# Altium PCB PCB1.PcbDoc (part 2 of 2)
Units mil, origin at the board's own origin, x right, y up, seen from the top; angles counter-clockwise.
Board outline 3937.01 x 2559.06 mil, 4 copper layers (Top Layer, GND, 3V3, Bottom Layer), stack 23.756 mil thick; 182 components, 90 nets, 545 pads, 228 vias.
Unrouted connection lines stored in the file: 5.
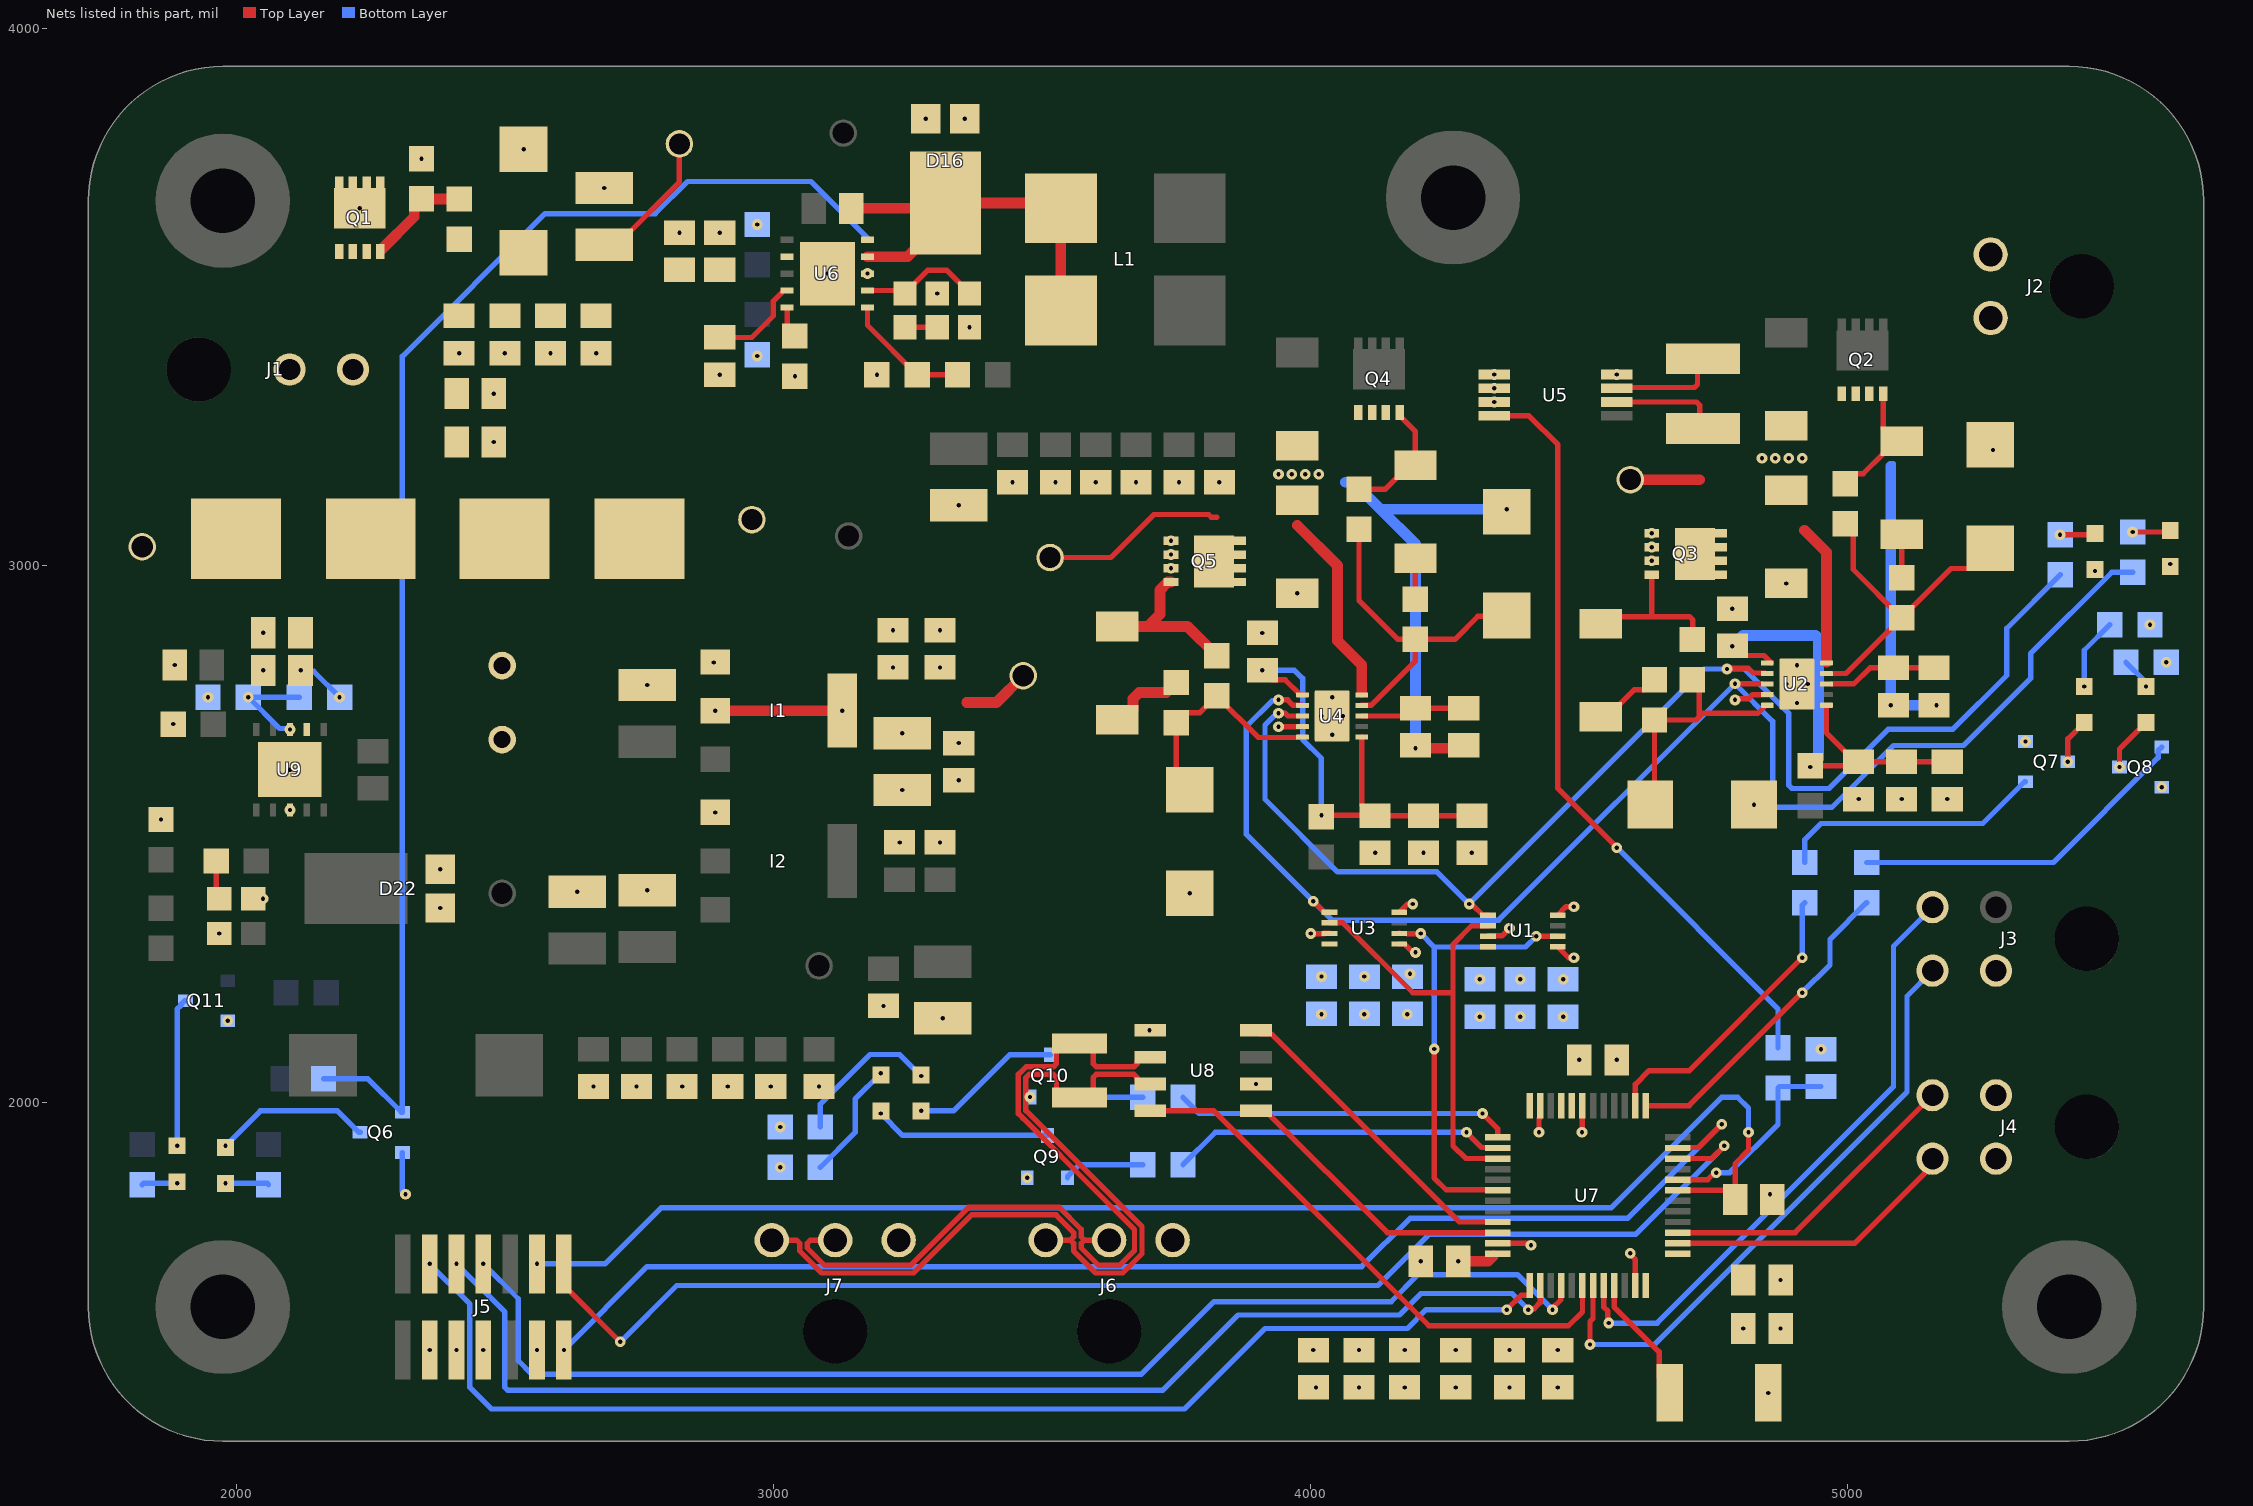
[diagram p4: the nets of this part, all layers, seen from the top]

## Via types
v1: diameter 20, hole 8, Top Layer to Bottom Layer, 228 vias

## Nets (pads, with @x,y where several pads share a name; then routed paths per layer and width w, separated by ;. In a path a pad name is that pad's centre, name@x,y a point inside that pad or via, vN(x,y) a via of type N, cw(c..) or ccw(c..) an arc to the next point about the centre after c; other vN are vias at no path point) (continued)
12V_HB_1: C9.2 C10.1 C11.1 C12.1 R4.1 U2.1 U2.6 | length 893.3
  Top Layer w10: v1(4785,2850) 4802.48,2832.52 4843.9,2832.52 U2.6@4857.64,2818.78 ; R4.1@4930,2627.4 5012.76,2627.4 C11.1@5020,2634.65 ; U2.1@4960.24,2740 4960.24,2688.31 5013.9,2634.65 C11.1@5020,2634.65 ; C12.1@5185,2634.65 C10.1@5100,2634.65 C11.1@5020,2634.65
  Bottom Layer w20: v1(4785,2850) 4804.63,2869.63 4939.51,2869.63 4945.37,2863.77 4945.37,2640.37 v1(4930,2625)
12V_HB_2: C23.1 C24.1 C25.1 C26.2 R15.1 U4.1 U4.6 | length 884.5
  Top Layer w10: C26.2@3910,2805.35 3927.83,2787.52 3952.48,2787.52 3980,2760 U4.6@3985,2760 ; R15.1@4020,2532.4 v1(4020,2535) ; R15.1@4022.6,2535 4113.9,2535 4119.65,2535 C23.1@4120,2534.65 ; U4.1@4095.12,2680.63 4095.12,2553.43 4113.9,2534.65 C23.1@4120,2534.65 ; C25.1@4300,2534.65 C24.1@4210,2534.65 C23.1@4120,2534.65
  Bottom Layer w10: v1(3910,2805) 3970,2805 3985,2790 3985,2676.35 4020,2641.35 v1(4020,2535)
BOOT: C57.2 U9.1 | length 108.6
  Top Layer w10: U9.1@2162.99,2694.8 2208.74,2694.8 2248.9,2654.65 C57.2@2255,2654.65
BOOT: C33.2 U6.1 | length 82.7
  Top Layer w10: U6.1@3025.39,3606.5 3031.3,3606.5 3057.52,3632.72 3057.52,3647.17 C33.2@3075.35,3665
BOOT: R25.2 U7.45 | length 242.9
  Top Layer w10: U7.45@4565,1660 4565,1620.11 4648.66,1536.45 4648.66,1490 4668.46,1470.2 R25.2@4668.46,1460
BOOTSTRAP_1: C16.1 C17.1 U2.3 | length 202.3
  Top Layer w10: U2.3@4970,2780 5011.42,2780 5041.06,2809.65 C17.1@5085,2809.65 C16.1@5160,2809.65
BOOTSTRAP_2: C21.1 C22.1 U4.3 | length 195.9
  Top Layer w10: U4.3@4095.12,2720 4180.35,2720 C21.1@4195,2734.65 C22.1@4285,2734.65
CAN_H: J6.3 J7.3 R32.2 U8.7 | length 1624
  Top Layer w10: J7.3@2996.89,1744.29 3043.09,1744.29 3048.94,1738.43 3048.94,1724.08 3089.73,1683.29 3261.05,1683.29 3369.05,1791.29 3526.36,1791.29 3558.94,1758.7 3558.94,1750.15 3553.09,1744.29 ; J6.3@3506.89,1744.29 3553.09,1744.29 ; U8.7@3701.57,2035 3683.86,2035 3677.05,2041.81 3677.05,2047.14 3671.19,2053 3641.39,2053 3601.05,2053 3595.2,2047.14 3595.2,2023.5 3581.5,2009.8 R32.2@3570,2009.8 3540.5,2009.8 3526.8,2023.5 3526.8,2047.14 3520.95,2053 3475.86,2053 3470,2047.14 3470,1985.56 3619.93,1835.63 3686,1769.56 3686,1719.02 3650.27,1683.29 3599.73,1683.29 3558.94,1724.08 3558.94,1738.43 3553.09,1744.29
CAN_L: J6.2 J7.2 R32.1 U8.6 | length 1600.8
  Top Layer w10: J7.2@3115,1744.29 3068.8,1744.29 3062.94,1738.43 3062.94,1729.88 3095.53,1697.29 3255.25,1697.29 3363.25,1805.29 3532.16,1805.29 3572.94,1764.5 3572.94,1750.15 3578.8,1744.29 ; J6.2@3625,1744.29 3578.8,1744.29 ; U8.6@3701.57,2085 3683.86,2085 3677.05,2078.19 3677.05,2072.86 3671.19,2067 3647.18,2067 3601.05,2067 3595.2,2072.86 3595.2,2096.5 3581.5,2110.2 R32.1@3570,2110.2 3540.5,2110.2 3526.8,2096.5 3526.8,2072.86 3520.95,2067 3470.06,2067 3456,2052.94 3456,1979.76 3464.2,1971.56 3605.93,1829.83 3672,1763.76 3672,1724.82 3644.47,1697.29 3605.53,1697.29 3572.94,1729.88 3572.94,1738.43 3578.8,1744.29
CAN_RX_LED: R33.1 U7.25 | length 626.2
  Top Layer w10: v1(4320,1980) 4348.46,1951.54 U7.25@4348.46,1935.59
  Bottom Layer w10: R33.1@3762.4,2010 3792.4,1980 v1(4320,1980)
CAN_STB: U7.42 U8.8 | length 1029.9
  Top Layer w10: U8.8@3701.57,1985 3820,1985 4220,1585 4480,1585 4505.94,1610.94 U7.42@4505.94,1660
CAN_TX_LED: R30.1 U7.26 | length 623
  Top Layer w10: v1(4290,1945) 4318.09,1916.91 4347.46,1916.91 U7.26@4348.46,1915.91
  Bottom Layer w10: R30.1@3762.4,1885 3822.4,1945 v1(4290,1945)
COMP: C56.2 R38.2 U9.7 | length 285.5
  Top Layer w10: C56.2@2031.5,2315 2032.48,2315 2085,2367.52 2085,2402.4 R38.2@2037.4,2450 2068.5,2481.1 U9.7@2068.5,2545.2
COMP: C32.2 R20.2 U6.7 | length 229.5
  Top Layer w10: U6.7@3175,3512.01 3239.49,3512.01 R20.2@3245,3506.5 3245,3507.48 3287.52,3550 3322.48,3550 3365,3507.48 C32.2@3365,3506.5
CS: C27.2 R16.2 U7.8 | length 378.4
  Top Layer w10: U7.8@4683.11,1856.85 4739.14,1856.85 4752.29,1870 v1(4755,1870)
  Bottom Layer w10: v1(4755,1870) 4780,1870 4870,1960 R16.2@4870,2027.6 4872.76,2030.35 C27.2@4950,2030.35
DEBUG_1: R27.1 U7.13 | length 595.4
  Top Layer w10: U7.13@4624.06,1994.65 4704.65,1994.65 v1(4915,2205)
  Bottom Layer w10: v1(4915,2205) 4966.65,2256.65 4966.65,2304.24 R27.1@5035,2372.6
DEBUG_2: R26.1 U7.14 | length 552.6
  Top Layer w10: U7.14@4604.37,1994.65 4604.37,2034.37 4630,2060 4705,2060 v1(4915,2270)
  Bottom Layer w10: v1(4915,2270) 4915,2367.6 R26.1@4920,2372.6
EN: R35.1 R36.2 U9.3 | length 197.7
  Bottom Layer w10: v1(2100,2694.8) 2098.09,2696.72 2080.69,2696.72 v1(2022.4,2755) R35.1@2117.6,2755
FB: R41.1 R42.2 U9.6 | length 305.6
  Top Layer w10: R41.1@1860,2362.4 R42.2@1860,2452.6 1905.22,2452.6 1997.82,2545.2 U9.6@2037.01,2545.2
FB: R23.1 R24.2 U6.6 | length 239
  Top Layer w10: U6.6@3175,3480.51 3175,3447.4 R24.2@3267.4,3355 R23.1@3342.6,3355
FDCAN_RX: U7.33 U8.4 | length 597.9
  Top Layer w10: U8.4@3898.43,2135 3905.24,2128.19 3926.81,2128.19 4276.89,1778.11 U7.33@4348.46,1778.11
FDCAN_TX: U7.34 U8.1 | length 543.9
  Top Layer w10: U8.1@3898.43,1985 3916.14,1985 4142.72,1758.43 U7.34@4348.46,1758.43
GND: C1.1 C2.1 C3.1 C4.1 C5.1 C6.1 C7.1 C8.1 C9.1 C10.2 C11.2 C12.2 C13.2 C14.2 C15.2 C18.2 C19.2 C20.2 C23.2 C24.2 C25.2 C26.1 C27.1 C28.1 C29.1 C30.1 C31.1 C32.1 C34.1 C35.1 C36.1 C37.1 C38.1 C39.1 C40.1 C41.2 C42.1 C43.1 C44.1 C45.1 C46.1 C47.1 C48.1 C49.1 C50.1 C51.1 C52.1 C53.1 C54.1 C55.1 C56.1 C58.1 C59.1 C60.1 C61.1 C62.1 C63.1 C64.1 C65.1 C66.1 C67.1 C68.1 C69.1 C70.1 C71.1 C72.1 C73.1 C74.1 D1.1 D2.1 D8.1 D10.1 D15.1 D16.1 D22.1 DIR1.2 DIR2.2 I1.1 I2.1 J3.2 J4.1 J4.2 J5.05 J5.07 J5.11 J6.1 J7.1 Q1.3 Q3.2 Q5.2 Q6.2 Q7.2 Q8.2 Q9.2 Q10.2 Q11.2 R2.2 R18.1 R19.1 R24.1 R25.1 R36.1 R37.1 R42.1 U1.1 U1.4 U1.7 U2.9 U2.11 U3.1 U3.4 U3.7 U4.9 U4.11 U5.4 U5.7 U6.8 U6.11 U7.19 U7.23 U7.35 U7.47 U8.2 U9.8 U9.11 | length 641.2
  Top Layer w10: v1(3940,2700) U4.9@3984.88,2700 ; v1(4000,2315) 4025.08,2315 4025.39,2315.31 U3.7@4035.08,2315.31 ; U3.1@4165,2295.63 4174.69,2295.63 4188.4,2281.91 4193.09,2281.91 v1(4195,2280) ; U3.4@4165,2354.68 4165,2355 4180,2370 v1(4190,2370) ; U1.7@4330,2310 4330.76,2310.76 4355.76,2310.76 v1(4370,2325) ; U7.35@4348.46,1738.74 4403.55,1738.74 4407.29,1735 v1(4410,1735) ; v1(4425,1945) 4425,1970 4426.2,1971.2 4426.2,1993.65 U7.23@4427.2,1994.65 ; U1.1@4459.92,2290.32 4459.92,2290 4479.92,2270 v1(4490,2270) ; U1.4@4459.92,2349.37 4459.92,2349.68 4475.24,2365 v1(4490,2365) ; v1(4505,1945) 4505.47,1945.47 4505.47,1994.17 U7.19@4505.94,1994.65 ; v1(4595,1720) 4595,1717.29 4604.37,1707.92 U7.47@4604.37,1660 ; v1(4790,2750) 4791.9,2751.9 4815,2751.9 4822.79,2759.69 U2.9@4850,2759.69
  Bottom Layer w10: Q6.2@2309.37,1907.6 2309.37,1835.63 v1(2315,1830)
  other v1: 4851.54,1460 4010,1470 4090,1470 4175,1470 4270,1470 4370,1470 4460,1470 2410,1540 2460,1540 2560,1540 4874.65,1580 4874.65,1670 4205,1705 4855,1830 3472.6,1860.63 3477.6,2010.63 2665,2030.35 2745,2030.35 2830,2030.35 2915,2030.35 2995,2030.35 3085,2030.35 3898.43,2035 4570,2080 4950,2099.65 1984.37,2152.6 3315,2157.2 4315,2160 4390,2160 4470,2160 4020,2165 4100,2165 4180,2165 3205,2180.35 1968.5,2315 2380,2362.56 2050,2380 3775,2389.88 2635,2392.8 2765,2395.59 2380,2435 4120,2465.35 4210,2465.35 4300,2465.35 3235,2484.65 3310,2484.65 1860,2527.4 2891.89,2540.55 2100,2545.2 4825.12,2555 5020,2565.35 5100,2565.35 5185,2565.35 3240,2582.2 5584.37,2587.6 3345,2600.35 2100,2620 5330.63,2672.4 1882.6,2705 1947.6,2755 2765,2777.8 2050.35,2805 1885.35,2815 2889.01,2819.56 2050.35,2875 3910,2874.65 3222.5,2879.65 3310,2879.65 4785,2919.65 3975,2948.39 4885,2966.77 5460,2990 3740,2995 5600,3003 4635,3008.81 3740,3020.59 4635,3034.4 3740,3046.19 4635,3060 3345,3112.2 3445,3155.35 3525,3155.35 3600,3155.35 3675,3155.35 3755,3155.35 3830,3155.35 2479.65,3230 4341.65,3304.41 2479.65,3320 3040,3352.6 2900,3355.35 3192.6,3355 4570,3355.59 2970,3390 2415,3395.35 2500,3395.35 2585,3395.35 2670,3395.35 3365,3443.5 3305,3506.5 3100.2,3543.5 3175,3543.5 2825,3619.65 2900,3619.65 2230,3665 2685,3702.8 2345,3757.4 2535,3775.12 3283.78,3831.77 3356.22,3831.77
HS_GATE_1: D3.2 R6.1 R8.1 U2.4 | length 619.8
  Top Layer w10: U2.4@4960.24,2799.02 4996.42,2799.02 R6.1@5100,2902.6 ; R8.1@4995,3077.6 5010,3062.6 5010,2992.6 R6.1@5100,2902.6 ; D3.2@5265,3032.2 5227.48,2994.68 5192.09,2994.68 R6.1@5100,2902.6
HS_GATE_2: D14.2 R10.1 R12.1 U4.4 | length 630.6
  Top Layer w10: R10.1@4090,3067.6 4090,2934.83 4162.24,2862.6 R12.1@4195,2862.6 ; U4.4@4095.12,2739.68 4112.49,2739.68 4195,2822.2 R12.1@4195,2862.6 ; D14.2@4365,2907.2 4363.44,2905.64 4311.37,2905.64 4268.33,2862.6 R12.1@4195,2862.6
LIMIT_A: J4.4 U7.2 | length 547.2
  Top Layer w10: U7.2@4683.11,1738.74 5013.28,1738.74 5157.6,1883.06 J4.4@5157.6,1895.94
LIMIT_B: J4.3 U7.3 | length 580.4
  Top Layer w10: U7.3@4683.11,1758.43 4901.97,1758.43 J4.3@5157.6,2014.06
LS_GATE_1: D2.2 R5.1 R7.1 U2.10 | length 452.7
  Top Layer w10: D2.2@4632.2,2555 4640,2562.8 R5.1@4640,2712.6 4717.4,2712.6 4723.26,2718.46 ; R7.1@4710,2787.6 4723.26,2774.34 4723.26,2718.46 ; U2.10@4846.25,2739.06 4832.19,2725 4729.8,2725 4723.26,2718.46
LS_GATE_2: D15.2 R11.1 R13.1 U4.10 | length 416.2
  Top Layer w10: D15.2@3775,2582.8 3750,2607.8 R13.1@3750,2707.6 3768.62,2726.22 3793.62,2726.22 R11.1@3825,2757.6 3902.6,2680 3975.09,2680 3975.44,2680.35 U4.10@3978.07,2680.35
M+: J2.2 R14.2 U5.3 | length 204.7
  Top Layer w10: U5.3@4570,3330 4592.91,3330 4594.5,3331.59 4714.14,3331.59 4720,3337.45 4720,3374.96 R14.2@4730,3384.96
M+_beforeCURR: C16.2 C17.2 D3.1 D7.1 D8.2 M+.1 Q2.2 Q3.3 R14.1 U2.5 U5.2 | length 1174
  Top Layer w10: U5.2@4570,3304.41 4718.28,3304.41 4724.14,3298.55 4724.14,3260.9 R14.1@4730,3255.04 R14.1@4770.35,3255.04 ; v1@4838.09,3201.91 v1(4840,3200)
  Top Layer w20: M+.1@4595,3160 4723.93,3160 ; 4919.37,3065.63 4960,3025 U2.5@4960,2820
  Bottom Layer w10: 5080,3185 5085,3190
  Bottom Layer w20: 5080,3185 v1(5080,2740) v1(5165,2740)
  other v1: 4865,3200 4890,3200 4915,3200 5270,3215
M-: C21.2 C22.2 D9.1 D10.2 D14.1 J2.1 M-.1 Q4.2 Q5.3 U4.5 | length 1590.1
  Top Layer w10: M-.1@3515,3015 3628.07,3015 3708.07,3095 3810,3095 3815,3090 3825,3090
  Top Layer w20: 3975,3075 4050,3000 4050,2860 4095.12,2814.88 4095.12,2764.68 ; v1(4195,2660) 4279.65,2660 C22.2@4285,2665.35
  Bottom Layer w20: 4065,3155 4080,3155 4130,3105 ; v1(4195,2660) 4195,3040 4130,3105 ; v1(4365,3105) 4130,3105
  other v1: 3940,3170 3965,3170 3990,3170 4015,3170
MOTOR_DIR: U1.6 U3.6 U7.27 | length 831.5
  Top Layer w10: U3.6@4035.08,2335 4060,2335 4190,2205 4265,2205 ; U1.6@4330,2329.88 4299.88,2329.88 4265,2295 4265,2205 ; U7.27@4348.46,1896.22 4288.78,1896.22 4265,1920 4265,2205
MOTOR_DIR_IN_1: R3.1 U1.5 U2.7 U4.8 | length 2471
  Top Layer w10: v1(3940,2725) 3953.07,2725 3958.07,2720 U4.8@3984.88,2720 ; v1(4295,2370) 4296.91,2368.09 4301.6,2368.09 4320.31,2349.37 U1.5@4330,2349.37 ; v1(4775.09,2807.52) 4776.4,2808.82 4815,2808.82 4823.82,2800 4844.94,2800 4845.88,2799.06 U2.7@4850,2799.06
  Bottom Layer w10: v1(3940,2725) 3937.29,2725 3932.29,2720 3931.72,2720 3915,2703.28 3915,2565 4050,2430 4235,2430 v1(4295,2370) 4732.52,2807.52 v1(4775.09,2807.52) 4807.48,2807.52 4890,2725 4890,2590.86 4895.86,2585 4965,2585 5075,2695 5195,2695 5295.69,2795.69 5295.69,2883.29 R3.1@5395,2982.6
MOTOR_DIR_IN_2: R9.1 U2.8 U3.5 U4.7 | length 2710.8
  Top Layer w10: v1(3940,2750) 3957.2,2750 3967.51,2739.68 U4.7@3984.88,2739.68 ; v1(4005,2375) 4005.08,2375 4025.39,2354.68 U3.5@4035.08,2354.68 ; v1(4790,2780) U2.8@4840,2780
  Bottom Layer w10: v1(3940,2750) 3938.09,2748.09 3928.09,2748.09 3880,2700 3880,2500 v1(4005,2375) 4040,2340 4350,2340 v1(4790,2780) 4860,2710 4860,2555.86 4865.86,2550 4970,2550 5085,2665 5215,2665 5340.13,2790.13 5340.13,2836.35 5491.38,2987.6 R9.1@5530,2987.6
MOTOR_PWM: U1.2 U3.2 U7.30 | length 871.6
  Top Layer w10: U3.2@4165,2315.31 4165.08,2315.24 4179.76,2315.24 4180,2315 v1(4205,2315) ; v1(4230,2100) 4230,1860 4251.83,1838.17 4347.46,1838.17 U7.30@4348.46,1837.17 ; v1(4420,2310) U1.2@4459.92,2310
  Bottom Layer w10: v1(4205,2315) 4230,2290 ; v1(4230,2100) 4230,2290 ; v1(4420,2310) 4400,2290 4230,2290
NetC31_2: C31.2 R20.1 | length 60
  Top Layer w10: R20.1@3245,3443.5 C31.2@3305,3443.5
NetC55_2: C55.2 R38.1 | length 72.4
  Top Layer w10: R38.1@1962.6,2450 1962.6,2385.91 C55.2@1968.5,2380
NetD4_1: DIR1.1 R3.2 | length 66.1
  Top Layer w10: v1(5395,3057.4) 5457.4,3057.4 DIR1.1@5460,3060
NetD5_1: D5.1 Q3.1 R7.2 | length 293
  Top Layer w10: D5.1@4540,2891.61 4553.39,2905 4635,2905 4705,2905 4711.38,2898.62 4711.38,2863.78 R7.2@4710,2862.4 ; 4635,2906.61 Q3.1@4635,2983.22
NetD5_2: D5.2 R5.2 | length 128.6
  Top Layer w10: D5.2@4540,2718.39 4551.81,2718.39 4602.2,2768.78 4621.38,2768.78 R5.2@4640,2787.4
NetD6_1: D6.1 Q2.1 R8.2 | length 236.2
  Top Layer w10: R8.2@4995,3152.4 5013.62,3171.02 5028.62,3171.02 5065.63,3208.03 5065.63,3209.06 D6.1@5088.19,3231.61 ; Q2.1@5065.59,3320 5065.59,3282.72 5065.63,3282.68 5065.63,3254.17 D6.1@5088.19,3231.61 ; D6.1@5100,3231.61 D6.1@5088.19,3231.61
NetD6_2: D6.2 R6.2 | length 81
  Top Layer w10: R6.2@5100,2977.4 D6.2@5100,3058.39
NetD11_1: DIR2.1 R9.2 | length 71.1
  Top Layer w10: v1(5530,3062.4) 5597.4,3062.4 DIR2.1@5600,3065
NetD12_1: D12.1 Q4.1 R10.2 | length 233.9
  Top Layer w10: R10.2@4090,3142.4 4138.98,3142.4 4183.19,3186.61 D12.1@4195,3186.61 4195,3249.68 4165.59,3279.09 Q4.1@4165.59,3285
NetD12_2: D12.2 R12.2 | length 76
  Top Layer w10: R12.2@4195,2937.4 D12.2@4195,3013.39
NetD13_1: D13.1 Q5.1 R11.2 | length 311.6
  Top Layer w20: D13.1@3640,2886.61 3696.81,2886.61 ; Q5.1@3740,2969.41 3734.09,2969.41 3719.37,2954.69 3719.37,2909.17 3696.81,2886.61 ; R11.2@3825,2832.4 3770.79,2886.61 3696.81,2886.61
NetD13_2: D13.2 R13.2 | length 151
  Top Layer w20: D13.2@3640,2713.39 3651.81,2713.39 3669.37,2730.94 3669.37,2752.06 3681.09,2763.78 3731.38,2763.78 R13.2@3750,2782.4
NetD17_1: 12V.1@1980,1850 R22.1 | length 81
  Bottom Layer w10: v1(1980,1850) 2057.6,1850 R22.1@2060,1847.6
NetD17_2: 12V.2 Q6.3 | length 294.1
  Bottom Layer w10: v1(1980,1920) 2045,1985 2188.66,1985 2228.66,1945 Q6.3@2230.63,1945
NetD18_1: BUG1.1 R28.1 | length 134.7
  Bottom Layer w10: v1(5440,2775) 5440,2842.4 R28.1@5487.6,2890
NetD18_2: BUG1.2 Q7.3 | length 85.7
  Top Layer w10: v1(5409.37,2635) 5409.37,2677.37 BUG1.2@5440,2708
NetD19_1: BUG2.1 R29.1 | length 60.5
  Bottom Layer w10: R29.1@5517.6,2820 5551.94,2785.66 5551.94,2778.06 v1(5555,2775)
NetD19_2: BUG2.2 Q8.3 | length 103.4
  Top Layer w10: v1(5505.63,2625) 5505.63,2658.63 BUG2.2@5555,2708
NetD20_1: R31.1 TX.1 | length 221.6
  Bottom Layer w10: R31.1@3087.4,1880 3152.06,1944.65 3152.06,2007.06 v1(3200,2055)
NetD20_2: Q9.3 TX.2 | length 326.8
  Bottom Layer w10: v1(3200,1980) 3240.63,1939.37 Q9.3@3510,1939.37
NetD21_1: R34.1 RX.1 | length 284.9
  Bottom Layer w10: R34.1@3087.4,1955 3087.4,1997.4 3180,2090 3235,2090 v1(3275,2050)
NetD21_2: Q10.3 RX.2 | length 283.2
  Bottom Layer w10: v1(3275,1985) 3335,1985 3439.37,2089.37 Q10.3@3515,2089.37
NetD23_1: 7V.1@1890,1853 R40.1 | length 66
  Bottom Layer w10: R40.1@1825,1847.6 1827.4,1850 v1(1890,1850)
NetD23_2: 7V.2 Q11.3 | length 277.6
  Bottom Layer w10: v1(1890,1920) 1890,2174.37 1896.85,2181.22 1896.85,2183.19 1903.66,2190 Q11.3@1905.63,2190
NetJ1_1: J1.1 Q1.2
NetQ1_1: Q1.1 R1.2 R2.1 | length 195.1
  Top Layer w20: Q1.1@2270.52,3588.47 2331.38,3649.33 2331.38,3668.98 R2.1@2345,3682.6 2345.1,3682.5 2414.9,3682.5 R1.2@2415,3682.4
NetQ7_1: Q7.1 R26.2 | length 497.8
  Bottom Layer w10: R26.2@4920,2447.4 4920,2490 4950,2520 5251.06,2520 5328.66,2597.6 Q7.1@5330.63,2597.6
NetQ8_1: Q8.1 R27.2 | length 646.1
  Bottom Layer w10: R27.2@5035,2447.4 5382.4,2447.4 5577.48,2642.48 5577.48,2655.59 5584.3,2662.4 Q8.1@5584.37,2662.4
NetQ9_1: Q9.1 R30.2 | length 151.4
  Bottom Layer w10: Q9.1@3547.4,1860.63 3547.4,1862.6 3569.8,1885 R30.2@3687.6,1885
NetQ10_1: Q10.1 R33.2 | length 135.5
  Bottom Layer w10: Q10.1@3552.4,2010.63 3686.97,2010.63 R33.2@3687.6,2010
NetR16_1: R16.1 U5.8 | length 1433.1
  Top Layer w10: U5.8@4341.65,3278.82 4406.18,3278.82 4460,3225 4460,2585 v1(4570,2475)
  Bottom Layer w10: v1(4570,2475) 4870,2175 R16.1@4870,2102.4
NRST: C41.1 J5.12 U7.7 | length 2686.2
  Top Layer w10: U7.7@4683.11,1837.17 4773.19,1837.17 C41.1@4790.35,1820 4790.35,1887.1 4815,1911.75 v1(4815,1945)
  Bottom Layer w10: v1(2560,1700.24) 2686.47,1700.24 2791.24,1805 4560,1805 4765,2010 4795,2010 4815,1990 v1(4815,1945)
PWRGD: Q11.1 R39.1 U9.10 | length 486.9
  Bottom Layer w10: Q11.1@1984.37,2227.4 1986.34,2227.4 2008.74,2205 R39.1@2092.6,2205 2095,2207.4 2095,2310 2162.99,2377.99 v1(2162.99,2545.2)
  other v1: 3175,3606.5
PWRGD: Q6.1 R21.1 U6.10 | length 2626.3
  Bottom Layer w10: R21.1@2162.4,2045 2244.8,2045 2307.4,1982.4 Q6.1@2309.37,1982.4 2309.37,3389.37 2575,3655 2780,3655 2840,3715 3070,3715 3176.75,3608.25
QUAD_A: J3.4 U7.43 | length 1142.7
  Top Layer w10: v1(4520,1550) 4520,1592.71 4525.63,1598.34 U7.43@4525.63,1660
  Bottom Layer w10: v1(4520,1550) 4640,1550 5110,2020 5110,2198.35 J3.4@5157.6,2245.94
QUAD_B: J3.3 U7.44 | length 1150.4
  Top Layer w10: U7.44@4545.31,1660 4545.31,1620 4553.09,1612.23 4553.09,1591.91 v1(4555,1590)
  Bottom Layer w10: v1(4555,1590) 4645,1590 5085,2030 5085,2291.46 J3.3@5157.6,2364.06
RT/CLK: R37.2 U9.5 | length 83.8
  Top Layer w10: R37.2@1957.4,2705 2024.53,2705 2034.72,2694.8 U9.5@2037.01,2694.8
RT/CLK: R19.2 U6.5 | length 59.2
  Top Layer w10: U6.5@3025.39,3480.51 3025.39,3442.01 R19.2@3040,3427.4
SS/TR: C54.2 U9.4 | length 184.5
  Top Layer w10: C54.2@1954.65,2815 1963.08,2806.57 1963.08,2776.92 2011.28,2728.72 2040.5,2728.72 2068.5,2700.71 U9.4@2068.5,2694.8
SS/TR: C30.2 U6.4 | length 177.7
  Top Layer w10: C30.2@2900,3424.65 2959.65,3424.65 3000,3465 3000,3492.52 3019.49,3512.01 U6.4@3025.39,3512.01
STLINK_RX: J5.13 U7.11 | length 2429.1
  Top Layer w10: U7.11@4683.11,1915.91 4700.61,1915.91 4701.61,1916.91 4721.91,1916.91 v1(4765,1960)
  Bottom Layer w10: v1(2610,1540) 2765,1695 4095,1695 4185,1785 4590,1785 v1(4765,1960)
STLINK_TX: J5.14 U7.10 | length 2491.7
  Top Layer w10: J5.14@2610,1700.24 2610,1659.88 2714.88,1555 v1(2715,1555) ; U7.10@4683.11,1896.22 4746.22,1896.22 v1(4770,1920)
  Bottom Layer w10: v1(2715,1555) 2820,1660 4125,1660 4220,1755 4605,1755 v1(4770,1920)
SW: C57.1 D22.2 L2.1 U9.9 | length 756.1
  Top Layer w20: U9.9@2131.5,2545.2 2131.5,2488.5 2145.94,2474.06 2145.94,2446.54 2193.7,2398.78 D22.2@2223.23,2398.78 ; L2.1@2161.5,2070 2161.5,2337.64 2222.64,2398.78 D22.2@2223.23,2398.78 ; C57.1@2255,2585.35 2255,2430.55 D22.2@2223.23,2398.78
SW: C33.1 D16.2 L1.1 U6.9 | length 792.4
  Top Layer w20: C33.1@3144.65,3665 3310,3665 D16.2@3320,3675 ; U6.9@3175,3575 3249.53,3575 3320,3645.47 D16.2@3320,3675 ; L1.1@3535,3475 L1.1@3535,3665 3525,3675 3330,3675 D16.2@3320,3675
SWCLK: J5.06 U7.38 | length 2321.2
  Top Layer w10: v1(4405,1615) 4406.91,1616.91 4416.21,1616.91 4427.2,1627.9 U7.38@4427.2,1660
  Bottom Layer w10: v1(2410,1700.24) 2500,1610.24 2500,1470 2505,1465 3725,1465 3865,1605 4165,1605 4205,1645 4375,1645 v1(4405,1615)
SWDIO: J5.04 U7.37 | length 2355.9
  Top Layer w10: v1(4365,1615) 4391.5,1641.5 4406.52,1641.5 4407.52,1642.5 U7.37@4407.52,1660
  Bottom Layer w10: v1(2360,1700.24) 2435,1625.24 2435,1470 2475,1430 3765,1430 3915,1580 4180,1580 4215,1615 v1(4365,1615)
SWO: J5.08 U7.40 | length 2297.9
  Top Layer w10: v1(4450,1615) 4450,1617.71 4465.57,1633.28 4465.57,1659 U7.40@4466.57,1660
  Bottom Layer w10: v1(2460,1700.24) 2525,1635.24 2525,1520 2550,1495 3685,1495 3820,1630 4150,1630 4200,1680 4385,1680 v1(4450,1615)
VBAT: C1.2 C2.2 C3.2 C4.2 C5.2 C6.2 C7.2 C8.2 D1.2 F1.1 F2.1 J1.2 R1.1 VBAT.1 | length 259.5
  Top Layer w10: C2.2@2685,3597.2 2708.43,3597.2 2825,3713.78 VBAT.1@2825,3785
VBAT_FUSED_7: 7F.1 C52.2 C53.2 F1.2 R35.2 U9.2 | length 93.1
  Bottom Layer w10: v1(2120,2805) 2121.91,2803.09 2144.31,2803.09 v1(2192.4,2755)
VBAT_FUSED_12: 12F.1 C28.2 C29.2 F2.2 R17.2 U6.2
  other v1: 2970,3635
VDD: 3V3.1 C13.1 C14.1 C15.1 C18.1 C19.1 C20.1 C42.2 C43.2 C44.2 C45.2 C46.2 C47.2 C48.2 C49.2 C50.2 C51.2 C67.2 C69.2 C71.2 C73.2 I1.2 I1.4 J5.03 R28.2 R29.2 R31.2 R34.2 U1.8 U3.8 U5.5 U5.6 U7.1 U7.20 U7.21 U7.24 U7.36 U7.48 U8.5 | length 458
  Top Layer w4: v1(3700,2135) U8.5@3701.57,2135
  Top Layer w10: U7.36@4340,1714.84 4340,1718.06 4341,1719.06 U7.36@4348.46,1719.06
  Top Layer w20: v1(2891.89,2730) v1(3128.11,2730) ; 3360,2745 3415,2745 3V3.1@3465,2795 ; C48.2@4275.16,1705 4275.16,1711.62 4275.16,1705.16 v1(4275,1705) 4330.16,1705 U7.36@4340,1714.84
  other v1: 2360,1540 4005,1540 4090,1540 4175,1540 4270,1540 4370,1540 4460,1540 4805,1580 3012.6,1880 3012.6,1955 4500,2080 4315,2230 4390,2230 4470,2230 4020,2235 4100,2235 4185,2240 3345,2669.65 3240,2687.8 3222.5,2810.35 3310,2810.35 5592.4,2820 5562.4,2890 4341.65,3330 4341.65,3355.59
pads on no net: J1.3 J2.3 J3.5 J4.5 J5.01 J5.02 J5.09 J5.10 J6.4 J7.4 R17.1 R18.2 U1.3 U2.2 U3.3 U4.2 U5.1 U6.3 U7.4 U7.5 U7.6 U7.9 U7.12 U7.15 U7.16 U7.17 U7.18 U7.22 U7.28 U7.29 U7.31 U7.32 U7.39 U7.41 U7.46
copper on no net: | length 202
  Top Layer w10: v1(2970,3467.4) 2970,3505.42 3008.09,3543.5 3025.39,3543.5
  Bottom Layer w10: v1(2970,3467.4) 2970,3560.2
  other v1: 3017.6,2100

## Polygon pours and split planes (outlines as drawn)
5V on Top Layer "5V_L01_P007" (solid, pour order 7): 3400,2235 3390,2225 3045,2225 2955,2315 2955,2375 2915,2415 2855,2415 2855,2490 2940,2490 2960,2510 2960,2570 2945,2585 2855,2585 2810,2630 2705,2630 2705,2715 2825,2715 2870,2670 2945,2670 3085,2530 3175,2530 3185,2520 3185,2450 3340,2450 3350,2440 3350,2395 3400,2345
VDD on Top Layer "VDD_L01_P017" (solid, pour order 17): 4530,2110 4520,2120 4475,2120 4395,2040 4395,1970 4400,1965 4410,1965 4415,1970 4415,2020 4420,2025 4455,2025 4460,2020 4460,1970 4465,1965 4490,1965 4495,1970 4495,2035 4505,2045 4525,2045 4530,2050
VDD on Top Layer "VDD_L01_P016" (solid, pour order 16): 4665,1730 4620,1685 4615,1685 4615,1625 4700,1540 4830,1540 4840,1550 4840,1695 4805,1730 4690,1730
M+ on Top Layer "M+_L01_P014" (solid, pour order 14): 4655,3360 4665,3350 4800,3350 4805,3355 4805,3450 4845,3490 5125,3490 5215,3400 5305,3400 5330,3425 5330,3510 5305,3535 4685,3535 4655,3505
M+_beforeCURR on Top Layer "M+_BEFORECURR_L01_P013" (solid, pour order 13): 4665,3070 4665,3075 4665,3210 4650,3225 4650,3280 4660,3290 4790,3290 4810,3310 4840,3340 5045,3340 5050,3335 5050,3295 5045,3290 4995,3290 4930,3225 4930,3035 4905,3010 4815,3010 4775,2970 4675,2970 4665,2980
M- on Top Layer "M-_L01_P012" (solid, pour order 12): 3985,3305 4145,3305 4150,3300 4150,3260 4120,3230 4050,3230 4030,3210 4030,3105 4030,3025 4000,2995 3925,2995 3880,2950 3790,2950 3775,2965 3775,3065 3815,3105 3900,3105 3920,3125 3920,3240
12V on Top Layer "12V_L01_P010" (solid, pour order 10): 3725,3750 3705,3730 3705,3460 3630,3395 3390,3395 3385,3390 3385,3285 3315,3285 3290,3260 3290,3205 3875,3205 3900,3230 3900,3305 3915,3320 4180,3320 4180,3445 3875,3750
VBAT_FUSED_12 on Top Layer "VBAT_FUSED_12_L01_P009" (solid, pour order 9): 3020,3140 3017.5,3137.5 3017.5,3027.5 2960,2970 2665,2970 2665,3210 2775,3320 2775,3570 2790,3585 2940,3585 2940,3655 2955,3670 2995,3670 2995,3605 3010,3590 3040,3590 3040,3565 3010,3565 2975,3530 2955,3510 2895,3510 2825,3440 2825,3250 2910,3250
VDD on Top Layer "VDD_L01_P008" (solid, pour order 8): 3095,2660 3160,2660 3175,2645 3385,2645 3385,2810 3350,2845 3095,2845
7V on Top Layer "7V_L01_P006" (solid, pour order 6): 2465,2015 2565,2015 2615,2065 3115,2065 3145,2100 3145,2105 3145,2150 3000,2150 2925,2240 2925,2300 2925,2390 2860,2390 2855,2390 2830,2370 2830,2350 2580,2350 2465,2235 2465,2120
VBAT_FUSED_7 on Top Layer "VBAT_FUSED_7_L01_P005" (solid, pour order 5): 2090,3130 2090,2990 2150,2930 2150,2690 2135,2675 2120,2675 2120,2715 2085,2750 2085,2913 2027.22,2965 1915,2965 1915,3130
VBAT on Top Layer "VBAT_L01_P003" (solid, pour order 3): 2535,2785 2600,2850 2600,3155 2470,3155 2440,3185 2440,3350 2425,3365 2365,3365 2365,3420 2390,3445 2700,3445 2700,3520 2750,3570 2750,3645 2745,3650 2390,3650 2380,3640 2380,3565 2240,3425 2170,3425 2155,3410 2155,2960 2180,2935 2188.77,2931.71 2190.48,2930 2370,2930 2370,2875 2460,2785
NetJ1_1 on Top Layer "NETJ1_1_L01_P004" (solid, pour order 4): 2250,3600 2255,3595 2255,3550 2130,3425 2130,3335 2105,3310 2065,3310 2035,3340 2035,3495 2140,3600
M+_beforeCURR on Bottom Layer "M+_BEFORECURR_L04_P015" (solid, pour order 15): 5060,3175 5070,3165 5090,3165 5100,3175 5285,3175 5310,3200 5310,3225 5290,3245 4845,3245 4815,3215 4815,3195 4835,3175
M- on Bottom Layer "M-_L04_P011" (solid, pour order 11): 4360.86,3419.09 4419.09,3419.09 4525,3525 5280,3525 5345,3590 5345,3650 5285,3710 4530,3710 4285,3465 4210,3465 3925,3220 3900,3200 3900,3145 3930,3115 4038.23,3115
GND on GND "GND_L02_P000" (solid, pour order 0): 1555,3995 1560,4000 5880,4000 5880,1430 5690,1240 5615,1315 1680,1315
VDD on 3V3 "VDD_L03_P002" (solid, pour order 2): 1690,4065 1720,4035 5885,4035 5885,1260 5740,1115 5670,1185 1540,1185

## Silkscreen, mask and mechanical layers (free items; w line width, h text height)
Top Overlay:
  lines w10: 1995,3150 1995,3445 ; 2030,3200 2030,3205 ; 2045,3190 2045,3215 ; 2065,3175 2065,3230 ; 2065,3202.5 2092.5,3202.5 ; 2144.06,3446 2251,3446 ; 2255,3150 2255,3446 ; 2916,1789.06 2916,1916 2920,1920 3820.89,1920 3820.89,1784.76 ; 3207.5,1865 3262.5,1865 ; 3222.5,1845 3247.5,1845 ; 3232.5,1830 3237.5,1830 ; 3235,1865 3235,1892.5 ; 3702.5,1860 3757.5,1860 ; 3717.5,1840 3742.5,1840 ; 3727.5,1825 3732.5,1825 ; 3730,1860 3730,1887.5 ; 4997.5,2235 5025,2235 ; 5012.5,1885 5040,1885 ; 5012.5,2030 5040,2030 ; 5025,2207.5 5025,2262.5 ; 5040,1857.5 5040,1912.5 ; 5040,2002.5 5040,2057.5 ; 5045,2222.5 5045,2247.5 ; 5060,1872.5 5060,1897.5 ; 5060,2017.5 5060,2042.5 ; 5060,2232.5 5060,2237.5 ; 5075,1882.5 5075,1887.5 ; 5075,2027.5 5075,2032.5 ; 5145,3460 5190,3460 ; 5165,3435 5165,3485 ; 5165,3565 5165,3605 ; 5220.94,3380 5110,3380 5110,3549.06 5110,3660 5179.34,3660 5220.94,3660 ; 5230.94,1815 4900,1815 4900,2095 5230.94,2095 ; 5230.94,2165 4895,2165 4895,2445 5230.94,2445 ; 1725,1620 ccw(c1975,1620) 1975,1370 5412.01,1370 ccw(c5412.01,1620) 5662.01,1620 5662.01,3679.06 ccw(c5412.01,3679.06) 5412.01,3929.06 1975,3929.06 ccw(c1975,3679.06) 1725,3679.06 1725,1620
  text "VOUT" at 5090,3560 h60 r90
  text "VIN" at 2280,3405 h60 r270
  text "+" at 2180,3230 h60 r270
  text "5V" at 5070,2320 h60 r90
  text "A B" at 4980,2230 h60 r90
  text "QUAD" at 4875,2185 h60 r90
  text "CAN" at 3330,1940 h60
  text "LIM" at 4880,1870 h60 r90
  text "A B" at 4995,1870 h60 r90
  text "H" at 2980,1815 h60
  text "L" at 3095,1815 h60
  text "H" at 3475,1810 h60
  text "L" at 3590,1810 h60
  text "FLASH" at 2325,1400 h60

## Text inside footprints (layer, text, board x,y; h text height)
C1: Top Overlay "+" at 2620,2890 h30 r270; Top 3D Body "+" at 2620,2890 h30 r270